# Altium PCB WI-FI_HALOW_FGH100M_EXT01_V30.PcbDoc
Units mm, origin at the board's own origin, x right, y up, seen from the top; angles counter-clockwise.
Board outline 42 x 25 mm, 2 copper layers (F.Cu, B.Cu); 41 components, 40 nets, 168 pads, 199 vias.
Unrouted connection lines stored in the file: 21.
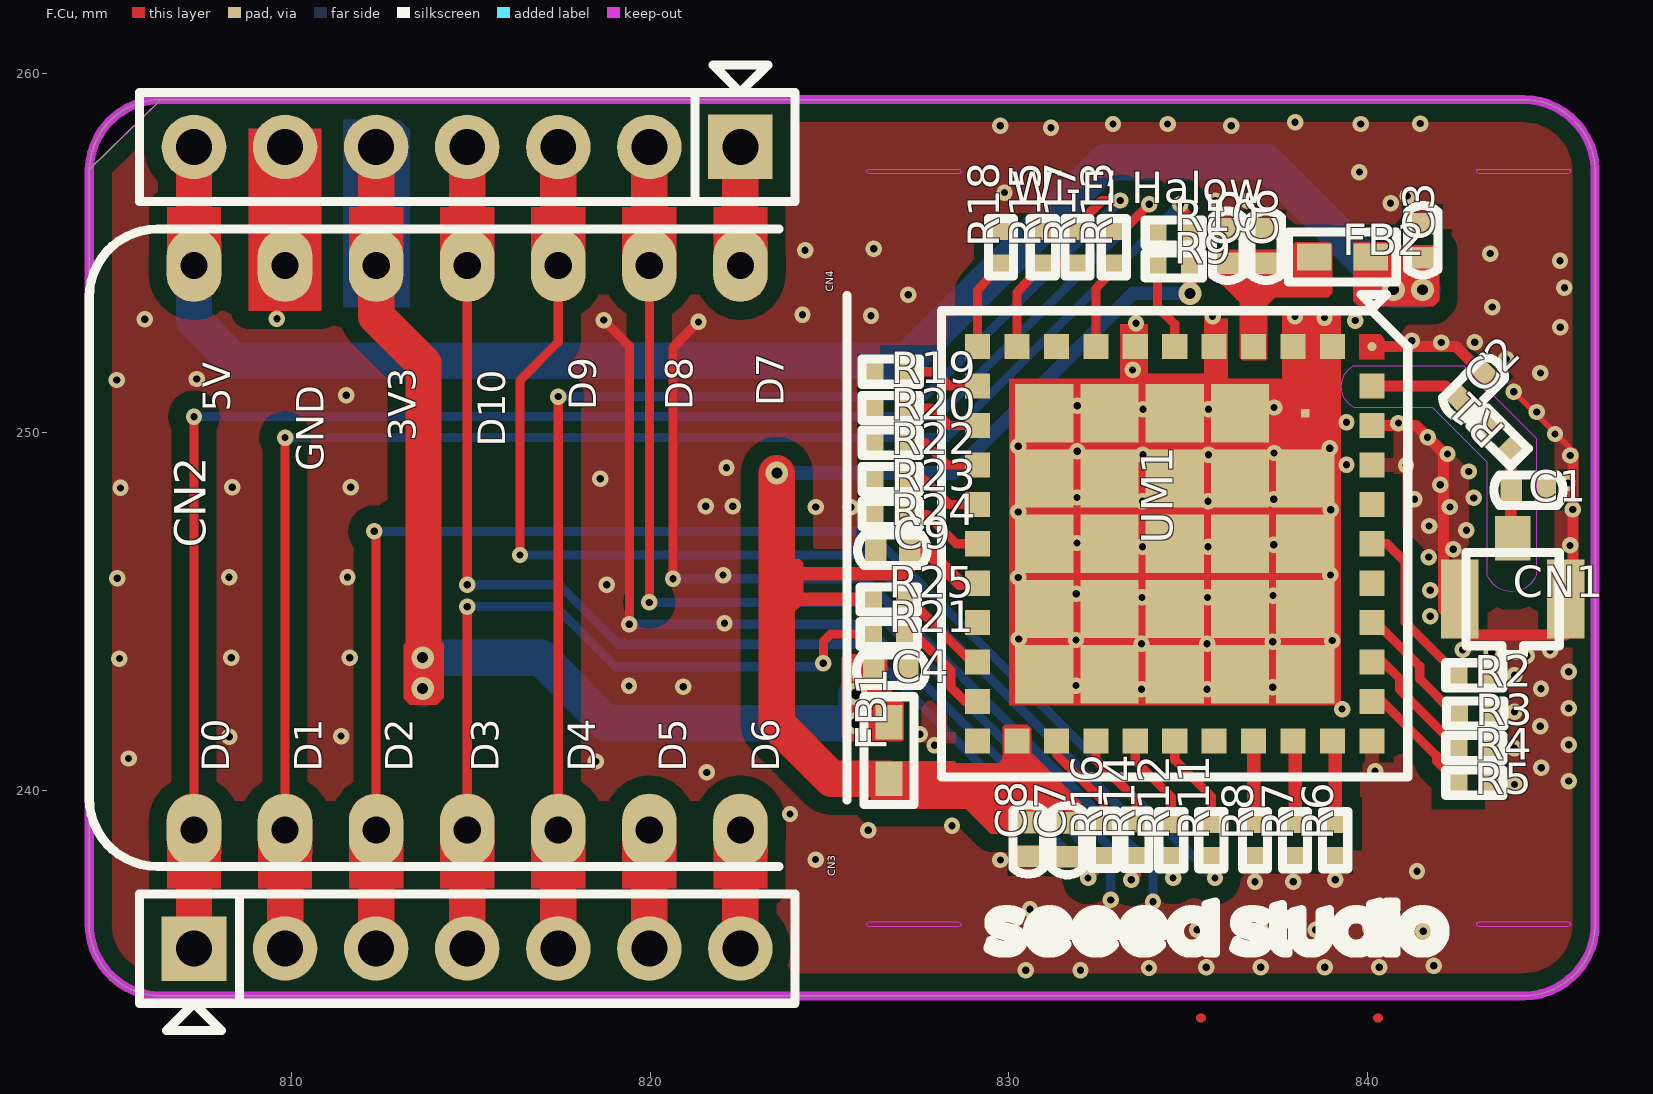
[diagram p0: F.Cu view]
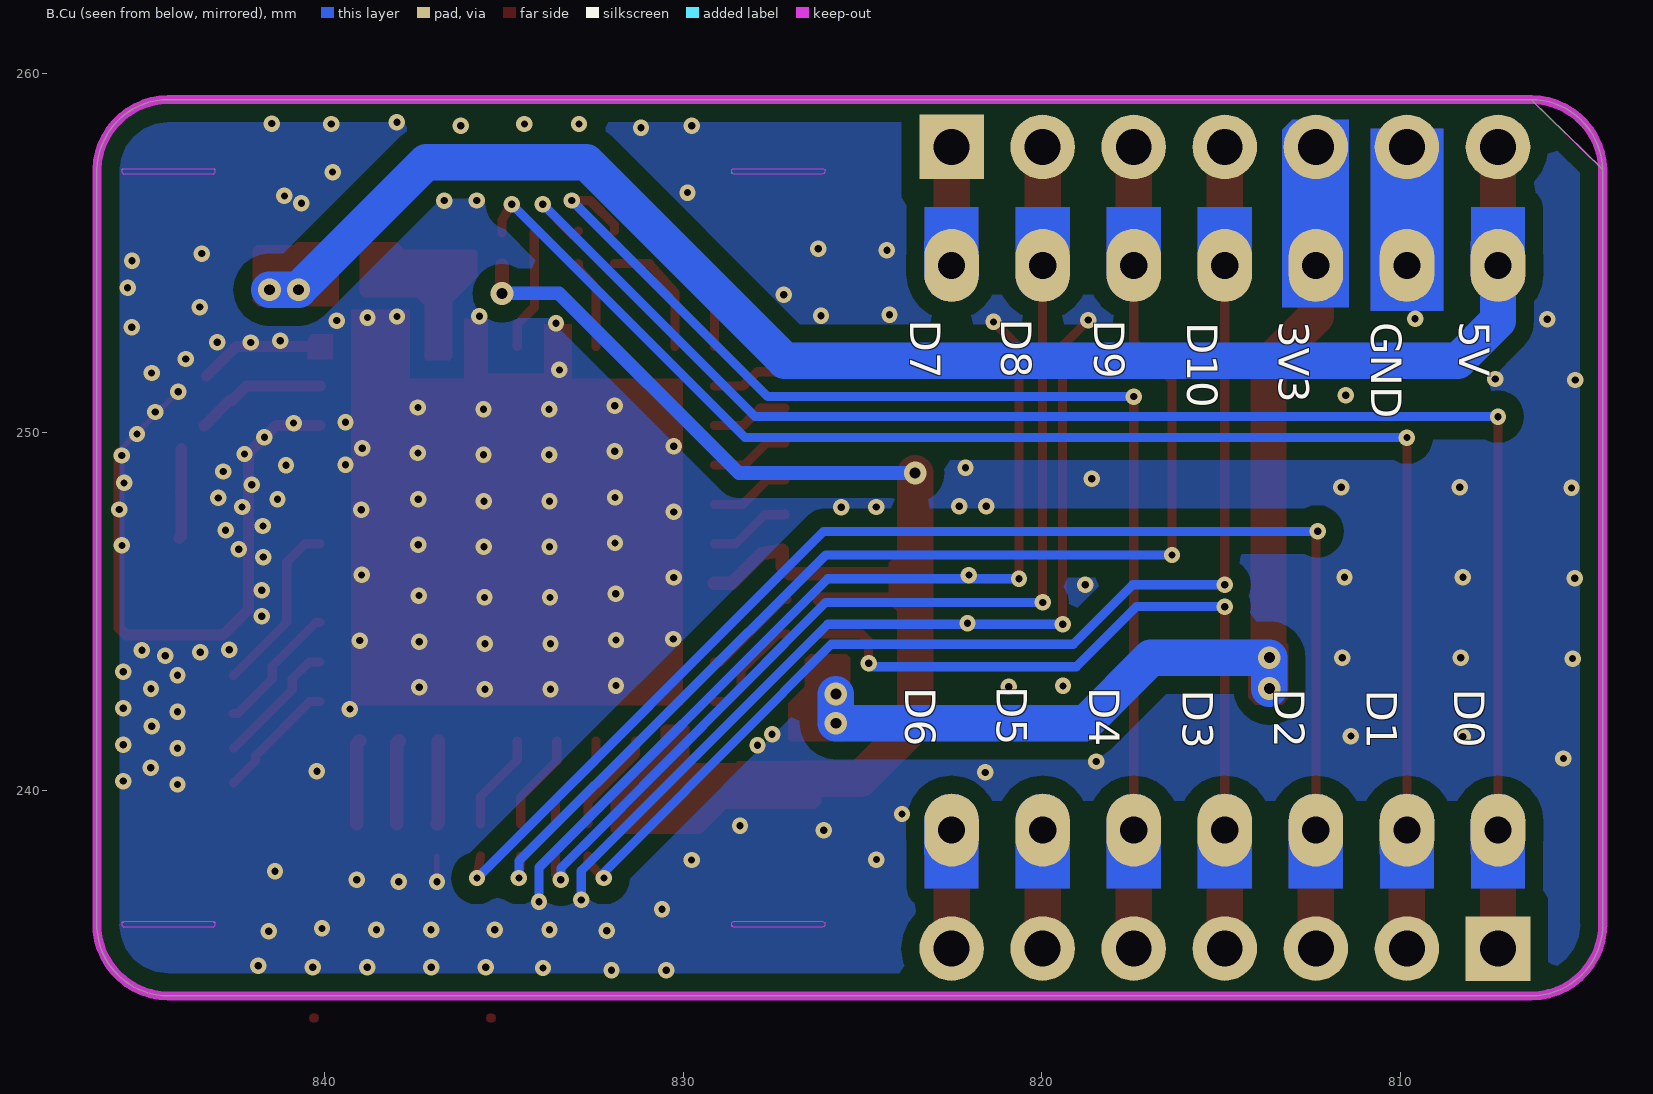
[diagram p1: B.Cu view, seen from below]

## Layer stack, top to bottom
F.Mask: solder mask 0.0102, Solder Resist, Dk 3.5
F.Cu: signal copper 0.0356
Dielectric 1: dielectric 0.32, FR-4, Dk 4.8
B.Cu: signal copper 0.0356
B.Mask: solder mask 0.0102, Solder Resist, Dk 3.5

## Board outline
806.357,259.279 ccw(c806.357,257.279) 804.357,257.33 804.357,236.33 804.357,236.329 ccw(c806.357,236.28) 806.357,234.279 844.357,234.279 ccw(c844.357,236.28) 846.357,236.33 846.357,257.33 ccw(c844.356,257.278) 844.356,259.28 844.357,259.279 806.357,259.279 ccw(c806.357,257.279) 806.357,259.279

## Design rules (kind name [scope] priority, off if disabled: settings)
Clearance "Clearence 0,5_Polygon" [InNamedPolygon('F.Cu-GND') OR InNamedPolygon('B.Cu-GND')] p1: gap=0.5 ignorepadtopadclearanceinfootprint=FALSE
MinimumSolderMaskSliver [All] p1: minsoldermaskwidth=0
PolygonConnect Polygon_B.Cu-GND_ConnectDirect [IsNamedPolygon('B.Cu-GND') vs IsVia] p1: connectstyle=Direct reliefconductorwidth=0.254 reliefentries=4 polygonreliefangle="90 Angle" airgapwidth=0.254
PolygonConnect Polygon_B.Cu-GND_ConnectRelief45 [IsNamedPolygon('B.Cu-GND') vs (IsThruPin or IsSMTPin) and (PadShape_AllLayers = 'Round')] p2: connectstyle=Relief reliefconductorwidth=0.381 reliefentries=4 polygonreliefangle="45 Angle" airgapwidth=0.254
PolygonConnect Polygon_B.Cu-GND_ConnectRelief90 [IsNamedPolygon('B.Cu-GND') vs (IsThruPin or IsSMTPin) and (PadShape_AllLayers <> 'Round')] p3: connectstyle=Relief reliefconductorwidth=0.381 reliefentries=4 polygonreliefangle="90 Angle" airgapwidth=0.254
PolygonConnect Polygon_F.Cu-GND_ConnectDirect [IsNamedPolygon('F.Cu-GND') vs IsVia] p4: connectstyle=Direct reliefconductorwidth=0.254 reliefentries=4 polygonreliefangle="90 Angle" airgapwidth=0.254
PolygonConnect Polygon_F.Cu-GND_ConnectRelief45 [IsNamedPolygon('F.Cu-GND') vs (IsThruPin or IsSMTPin) and (PadShape_AllLayers = 'Round')] p5: connectstyle=Relief reliefconductorwidth=0.381 reliefentries=4 polygonreliefangle="45 Angle" airgapwidth=0.254
PolygonConnect Polygon_F.Cu-GND_ConnectRelief90 [IsNamedPolygon('F.Cu-GND') vs (IsThruPin or IsSMTPin) and (PadShape_AllLayers <> 'Round')] p6: connectstyle=Relief reliefconductorwidth=0.381 reliefentries=4 polygonreliefangle="90 Angle" airgapwidth=0.254
RoutingVias [All] p1: holewidth=0.711 width=1.27 viastyle="Through Hole" minholewidth=0.711 minwidth=1.27 maxholewidth=0.711 maxwidth=1.27
SilkToSilkClearance [All] p1: silktosilkclearance=0
SilkToSolderMaskClearance [IsPad] p1: minsilkscreentomaskgap=0 clearancetoexposedcopper=TRUE
SolderMaskExpansion [All] p1: expansion=0 istentingtop=FALSE
Width [All] p1: maxlimit=10 minlimit=0.254 preferedwidth=0.254 minimp=50.000000 maximp=50.000000 favimp=50.000000
27 further rules are at their usual default settings.

## Components (designator, comment, footprint, x,y, rotation, side; value= is the part's Value field where it differs from the comment)
C1 "Comment" C0402M 844.491,248.388 r0 top value=C0402M
C2 "Comment" C0402M 842.967,251.233 r45 top value=C0402M
C3 "Comment" C0402M 841.544,255.347 r90 top value=C0402M
C4 "Comment" C0402M 826.711,243.359 r0 top value=C0402M
C5 "Comment" C0402M 836.109,255.195 r90 top value=C0402M
C6 "Comment" C0402M 837.175,255.195 r90 top value=C0402M
C7 "Comment" C0402M 831.638,238.634 r270 top value=C0402M
C8 "Comment" C0402M 830.544,238.65 r270 top value=C0402M
C9 "Comment" C0402M 826.761,246.711 r180 top value=C0402M
CN1 "Comment" CON_U.FL-R-SMT-1 844.057,245.346 r180 top value=CON_U.FL-R-SMT-1
CN2 "Comment" CN_ESP32S3_XIAO_DIP14 807.278,246.779 r90 top value=CN_ESP32S3_XIAO_DIP14
CN3 "Comment" HEADER_PIN_SIP7_2MM54 807.278,235.601 r90 top value=HEADER_PIN_SIP7_2MM54
CN4 "Comment" HEADER_PIN_SIP7_2MM54 822.518,257.958 r270 top value=HEADER_PIN_SIP7_2MM54
FB1 "Comment" FB0603 826.66,241.123 r270 top value=FB0603
FB2 "Comment" FB0603 839.309,254.89 r180 top value=FB0603
R1 "Comment" R0402 843.678,249.861 r135 top value=R0402
R2 "Comment" R0402 842.99,243.223 r0 top value=R0402
R3 "Comment" R0402 843.014,242.157 r0 top value=R0402
R4 "Comment" R0402 842.99,241.191 r0 top value=R0402
R5 "Comment" R0402 842.99,240.226 r0 top value=R0402
R6 "Comment" R0402 839.106,238.628 r270 top value=R0402
R7 "Comment" R0402 837.988,238.628 r270 top value=R0402
R8 "Comment" R0402 836.871,238.628 r270 top value=R0402
R9 "Comment" R0402 834.608,254.652 r180 top value=R0402
R10 "Comment" R0402 834.608,255.566 r180 top value=R0402
R11 "Comment" R0402 835.651,238.628 r270 top value=R0402
R12 "Comment" R0402 834.534,238.628 r270 top value=R0402
R13 "Comment" R0402 832.932,255.16 r270 top value=R0402
R14 "Comment" R0402 833.569,238.634 r270 top value=R0402
R15 "Comment" R0402 830.95,255.16 r270 top value=R0402
R16 "Comment" R0402 832.654,238.634 r270 top value=R0402
R17 "Comment" R0402 831.916,255.16 r270 top value=R0402
R18 "Comment" R0402 829.782,255.16 r270 top value=R0402
R19 "Comment" R0402 826.711,251.69 r0 top value=R0402
R20 "Comment" R0402 826.711,250.674 r0 top value=R0402
R21 "Comment" R0402 826.66,244.375 r180 top value=R0402
R22 "Comment" R0402 826.711,249.709 r0 top value=R0402
R23 "Comment" R0402 826.711,248.693 r0 top value=R0402
R24 "Comment" R0402 826.711,247.727 r0 top value=R0402
R25 "Comment" R0402 826.66,245.34 r180 top value=R0402
UM1 "Comment" FGH100M-H 834.631,246.89 r270 top value=FGH100M-H

## Footprints (in the part's own frame and the unit in brackets; to place one, negate y for a bottom-side part, rotate by r counter-clockwise, add the part's x,y. Pads: shape width x height; smd on the part's side, far side on the other; paste and mask are expansions set on the pad)
C0402M [mm]
  rect 0.6x0.65 smd mask+0.102: 1(-0.475,0) 2(0.475,0)
  silkscreen extent -0.96,-0.43 0.97,0.43
CN_ESP32S3_XIAO_DIP14 [mil]
  rrect100% 80x60 hole 30 paste-99999 mask+4: 1(-310,0) 2(-310,-100) 3(-310,-200) 4(-310,-300) 5(-310,-400) 6(-310,-500) 7(-310,-600) 8(310,-600) 9(310,-500) 10(310,-400) 11(310,-300) 12(310,-200) 13(310,-100) 14(310,0)
  F.Cu region: 299.96,-570.47 374.02,-570.47 374.02,-629.53 299.96,-629.78 292.25,-628.77 285.06,-625.79 278.9,-621.06 274.16,-614.89 271.19,-607.71 270.17,-600 271.19,-592.29 274.16,-585.11 278.9,-578.94 285.06,-574.21 292.25,-571.23 299.96,-570.22
  F.Cu region: 299.96,-470.47 374.02,-470.47 374.02,-529.53 299.96,-529.78 292.25,-528.77 285.06,-525.79 278.9,-521.06 274.16,-514.89 271.19,-507.71 270.17,-500 271.19,-492.29 274.16,-485.11 278.9,-478.94 285.06,-474.21 292.25,-471.23 299.96,-470.22
  F.Cu region: 299.96,-370.47 374.02,-370.47 374.02,-429.53 299.96,-429.78 292.25,-428.77 285.06,-425.79 278.9,-421.06 274.16,-414.89 271.19,-407.71 270.17,-400 271.19,-392.29 274.16,-385.11 278.9,-378.94 285.06,-374.21 292.25,-371.23 299.96,-370.22
  F.Cu region: 299.96,-270.47 374.02,-270.47 374.02,-329.53 299.96,-329.78 292.25,-328.77 285.06,-325.79 278.9,-321.06 274.16,-314.89 271.19,-307.71 270.17,-300 271.19,-292.29 274.16,-285.11 278.9,-278.94 285.06,-274.21 292.25,-271.23 299.96,-270.22
  F.Cu region: 299.96,-170.47 374.02,-170.47 374.02,-229.53 299.96,-229.78 292.25,-228.77 285.06,-225.79 278.9,-221.06 274.16,-214.89 271.19,-207.71 270.17,-200 271.19,-192.29 274.16,-185.11 278.9,-178.94 285.06,-174.21 292.25,-171.23 299.96,-170.22
  F.Cu region: 299.96,-70.47 374.02,-70.47 374.02,-129.53 299.96,-129.78 292.25,-128.77 285.06,-125.79 278.9,-121.06 274.16,-114.89 271.19,-107.71 270.17,-100 271.19,-92.29 274.16,-85.11 278.9,-78.94 285.06,-74.21 292.25,-71.23 299.96,-70.22
  F.Cu region: 299.96,29.53 374.02,29.53 374.02,-29.53 299.96,-29.78 292.25,-28.77 285.06,-25.79 278.9,-21.06 274.16,-14.89 271.19,-7.71 270.17,0 271.19,7.71 274.16,14.89 278.9,21.06 285.06,25.79 292.25,28.77 299.96,29.78
  F.Cu region: -292.25,-571.23 -285.06,-574.21 -278.9,-578.94 -274.16,-585.11 -271.19,-592.29 -270.17,-600 -271.19,-607.71 -274.16,-614.89 -278.9,-621.06 -285.06,-625.79 -292.25,-628.77 -299.96,-629.78 -374.02,-629.53 -374.02,-570.47 -299.96,-570.47 -299.96,-570.22
  F.Cu region: -292.25,-471.23 -285.06,-474.21 -278.9,-478.94 -274.16,-485.11 -271.19,-492.29 -270.17,-500 -271.19,-507.71 -274.16,-514.89 -278.9,-521.06 -285.06,-525.79 -292.25,-528.77 -299.96,-529.78 -374.02,-529.53 -374.02,-470.47 -299.96,-470.47 -299.96,-470.22
  F.Cu region: -292.25,-371.23 -285.06,-374.21 -278.9,-378.94 -274.16,-385.11 -271.19,-392.29 -270.17,-400 -271.19,-407.71 -274.16,-414.89 -278.9,-421.06 -285.06,-425.79 -292.25,-428.77 -299.96,-429.78 -374.02,-429.53 -374.02,-370.47 -299.96,-370.47 -299.96,-370.22
  F.Cu region: -292.25,-271.23 -285.06,-274.21 -278.9,-278.94 -274.16,-285.11 -271.19,-292.29 -270.17,-300 -271.19,-307.71 -274.16,-314.89 -278.9,-321.06 -285.06,-325.79 -292.25,-328.77 -299.96,-329.78 -374.02,-329.53 -374.02,-270.47 -299.96,-270.47 -299.96,-270.22
  F.Cu region: -292.25,-171.23 -285.06,-174.21 -278.9,-178.94 -274.16,-185.11 -271.19,-192.29 -270.17,-200 -271.19,-207.71 -274.16,-214.89 -278.9,-221.06 -285.06,-225.79 -292.25,-228.77 -299.96,-229.78 -374.02,-229.53 -374.02,-170.47 -299.96,-170.47 -299.96,-170.22
  F.Cu region: -292.25,-71.23 -285.06,-74.21 -278.9,-78.94 -274.16,-85.11 -271.19,-92.29 -270.17,-100 -271.19,-107.71 -274.16,-114.89 -278.9,-121.06 -285.06,-125.79 -292.25,-128.77 -299.96,-129.78 -374.02,-129.53 -374.02,-70.47 -299.96,-70.47 -299.96,-70.22
  F.Cu region: -292.25,28.77 -285.06,25.79 -278.9,21.06 -274.16,14.89 -271.19,7.71 -270.17,0 -271.19,-7.71 -274.16,-14.89 -278.9,-21.06 -285.06,-25.79 -292.25,-28.77 -299.96,-29.78 -374.02,-29.53 -374.02,29.53 -299.96,29.53 -299.96,29.78
  B.Cu region: 299.85,-570.47 374.02,-570.47 374.02,-629.53 299.85,-629.78 292.14,-628.77 284.96,-625.79 278.79,-621.06 274.06,-614.89 271.08,-607.71 270.07,-600 271.08,-592.29 274.06,-585.11 278.79,-578.94 284.96,-574.21 292.14,-571.23 299.85,-570.22
  B.Cu region: 299.85,-470.47 374.02,-470.47 374.02,-529.53 299.85,-529.78 292.14,-528.77 284.96,-525.79 278.79,-521.06 274.06,-514.89 271.08,-507.71 270.07,-500 271.08,-492.29 274.06,-485.11 278.79,-478.94 284.96,-474.21 292.14,-471.23 299.85,-470.22
  B.Cu region: 299.85,-370.47 374.02,-370.47 374.02,-429.53 299.85,-429.78 292.14,-428.77 284.96,-425.79 278.79,-421.06 274.06,-414.89 271.08,-407.71 270.07,-400 271.08,-392.29 274.06,-385.11 278.79,-378.94 284.96,-374.21 292.14,-371.23 299.85,-370.22
  B.Cu region: 299.85,-270.47 374.02,-270.47 374.02,-329.53 299.85,-329.78 292.14,-328.77 284.96,-325.79 278.79,-321.06 274.06,-314.89 271.08,-307.71 270.07,-300 271.08,-292.29 274.06,-285.11 278.79,-278.94 284.96,-274.21 292.14,-271.23 299.85,-270.22
  B.Cu region: 299.85,-170.47 374.02,-170.47 374.02,-229.53 299.85,-229.78 292.14,-228.77 284.96,-225.79 278.79,-221.06 274.06,-214.89 271.08,-207.71 270.07,-200 271.08,-192.29 274.06,-185.11 278.79,-178.94 284.96,-174.21 292.14,-171.23 299.85,-170.22
  B.Cu region: 299.85,-70.47 374.02,-70.47 374.02,-129.53 299.85,-129.78 292.14,-128.77 284.96,-125.79 278.79,-121.06 274.06,-114.89 271.08,-107.71 270.07,-100 271.08,-92.29 274.06,-85.11 278.79,-78.94 284.96,-74.21 292.14,-71.23 299.85,-70.22
  B.Cu region: 299.85,29.53 374.02,29.53 374.02,-29.53 299.85,-29.78 292.14,-28.77 284.96,-25.79 278.79,-21.06 274.06,-14.89 271.08,-7.71 270.07,0 271.08,7.71 274.06,14.89 278.79,21.06 284.96,25.79 292.14,28.77 299.85,29.78
  B.Cu region: -292.14,-571.23 -284.96,-574.21 -278.79,-578.94 -274.06,-585.11 -271.08,-592.29 -270.07,-600 -271.08,-607.71 -274.06,-614.89 -278.79,-621.06 -284.96,-625.79 -292.14,-628.77 -299.85,-629.78 -374.02,-629.53 -374.02,-570.47 -299.85,-570.47 -299.85,-570.22
  B.Cu region: -292.14,-471.23 -284.96,-474.21 -278.79,-478.94 -274.06,-485.11 -271.08,-492.29 -270.07,-500 -271.08,-507.71 -274.06,-514.89 -278.79,-521.06 -284.96,-525.79 -292.14,-528.77 -299.85,-529.78 -374.02,-529.53 -374.02,-470.47 -299.85,-470.47 -299.85,-470.22
  B.Cu region: -292.14,-371.23 -284.96,-374.21 -278.79,-378.94 -274.06,-385.11 -271.08,-392.29 -270.07,-400 -271.08,-407.71 -274.06,-414.89 -278.79,-421.06 -284.96,-425.79 -292.14,-428.77 -299.85,-429.78 -374.02,-429.53 -374.02,-370.47 -299.85,-370.47 -299.85,-370.22
  B.Cu region: -292.14,-271.23 -284.96,-274.21 -278.79,-278.94 -274.06,-285.11 -271.08,-292.29 -270.07,-300 -271.08,-307.71 -274.06,-314.89 -278.79,-321.06 -284.96,-325.79 -292.14,-328.77 -299.85,-329.78 -374.02,-329.53 -374.02,-270.47 -299.85,-270.47 -299.85,-270.22
  B.Cu region: -292.14,-171.23 -284.96,-174.21 -278.79,-178.94 -274.06,-185.11 -271.08,-192.29 -270.07,-200 -271.08,-207.71 -274.06,-214.89 -278.79,-221.06 -284.96,-225.79 -292.14,-228.77 -299.85,-229.78 -374.02,-229.53 -374.02,-170.47 -299.85,-170.47 -299.85,-170.22
  B.Cu region: -292.14,-71.23 -284.96,-74.21 -278.79,-78.94 -274.06,-85.11 -271.08,-92.29 -270.07,-100 -271.08,-107.71 -274.06,-114.89 -278.79,-121.06 -284.96,-125.79 -292.14,-128.77 -299.85,-129.78 -374.02,-129.53 -374.02,-70.47 -299.85,-70.47 -299.85,-70.22
  B.Cu region: -292.14,28.77 -284.96,25.79 -278.79,21.06 -274.06,14.89 -271.08,7.71 -270.07,0 -271.08,-7.71 -274.06,-14.89 -278.79,-21.06 -284.96,-25.79 -292.14,-28.77 -299.85,-29.78 -374.02,-29.53 -374.02,29.53 -299.85,29.53 -299.85,29.78
  silkscreen extent -350,-717 350,115
CON_U.FL-R-SMT-1 [mm]
  rect 1x1.25 smd mask+0.102: 1(0,-1.7)
  rect 1.05x2.2 smd mask+0.102: 2(1.475,0) 3(-1.475,0)
  silkscreen extent -1.3,-1.3 1.3,1.55
FB0603 [mil]
  rect 38x30 smd mask+4: 1(-31,0) 2(31,0)
  silkscreen extent -59,-28 59,28
FGH100M-H [mm]
  round 0.25 smd mask+0.05: 1(-5.5,5.5)
  rect 0.7x0.7 smd mask+0.05: 2(-5.5,4.4) 3(-5.5,3.3) 4(-5.5,2.2) 5(-5.5,1.1) 6(-5.5,0) 7(-5.5,-1.1) 8(-5.5,-2.2) 9(-5.5,-3.3) 10(-5.5,-4.4) 11(-5.5,-5.5) 12(-4.4,-5.5) 13(-3.3,-5.5) 14(-2.2,-5.5) 15(-1.1,-5.5) 16(0,-5.5) 17(1.1,-5.5) 18(2.2,-5.5) 19(3.3,-5.5) 20(4.4,-5.5) 21(5.5,-5.5) 22(5.5,-4.4) 23(5.5,-3.3) 24(5.5,-2.2) 25(5.5,-1.1) 26(5.5,0) 27(5.5,1.1) 28(5.5,2.2) 29(5.5,3.3) 30(5.5,4.4) 31(5.5,5.5) 32(4.4,5.5) 33(3.3,5.5) 34(2.2,5.5) 35(1.1,5.5) 36(0,5.5) 37(-1.1,5.5) 38(-2.2,5.5) 39(-3.3,5.5) 40(-4.4,5.5)
  rect 0.25x0.25 smd mask+0.05: 41(-3.64,3.64)
  rect 1.62x1.62 smd mask+0.05: 42(-1.82,3.64) 43(0,3.64) 44(1.82,3.64) 45(3.64,3.64) 46(-3.64,1.82) 47(-1.82,1.82) 48(0,1.82) 49(1.82,1.82) 50(3.64,1.82) 51(-3.64,0) 52(-1.82,0) 53(0,0) 54(1.82,0) 55(3.64,0) 56(-3.64,-1.82) 57(-1.82,-1.82) 58(0,-1.82) 59(1.82,-1.82) 60(3.64,-1.82) 61(-3.64,-3.64) 62(-1.82,-3.64) 63(0,-3.64) 64(1.82,-3.64) 65(3.64,-3.64)
  F.Cu region: -2.83,2.83 -4.45,2.83 -4.45,4.25 -4.25,4.45 -2.83,4.45
  F.Cu region: -5.15,5.15 -5.85,5.15 -5.85,5.725 -5.725,5.85 -5.15,5.85
  silkscreen extent -6.95,-6.5 6.5,6.5
HEADER_PIN_SIP7_2MM54 [mm]
  rect 1.8x1.8 hole 1 paste-2539.97 mask+0.102: 1(0,0)
  round 1.8 hole 1 paste-2539.97 mask+0.102: 2(0,-2.54) 3(0,-5.08) 4(0,-7.62) 5(0,-10.16) 6(0,-12.7) 7(0,-15.24)
  silkscreen extent -2.29,-16.76 1.52,1.52
R0402 [mm]
  rect 0.5x0.5 smd mask+0.102: 1(-0.45,0) 2(0.45,0)
  silkscreen extent -0.8,-0.35 0.8,0.35

## Part data
C1 C2 C3 C4 C5 C6 C7 C8 C9: library part C0402M
CN1: library part CON_U.FL-R-SMT-1
CN2: library part CN_ESP32S3_XIAO_DIP14
CN3 CN4: library part HEADER_PIN_SIP7_2MM54
FB1 FB2: library part FB0603
R1 R2 R3 R4 R5 R6 R7 R8 R9 R10 R11 R12 R13 R14 R15 R16 R17 R18 R19 R20 R21 R22 R23 R24 R25: library part R0402
UM1: library part FGH100M-H

## Via types
v1: diameter 0.457, hole 0.203, F.Cu to B.Cu, tented both sides, 191 vias
v2: diameter 0.635, hole 0.305, F.Cu to B.Cu, tented both sides, 8 vias

## Nets (pads, with @x,y where several pads share a name; then routed paths per layer and width w, separated by ;. In a path a pad name is that pad's centre, name@x,y a point inside that pad or via, vN(x,y) a via of type N, cw(c..) or ccw(c..) an arc to the next point about the centre after c; other vN are vias at no path point)
3V3: C4.1 CN2.12 CN4.5 FB1.1 | length 31.4
  F.Cu w0.152: v2(825.745,241.885) 825.745,242.343 ; v2(825.745,242.698) 825.745,242.343 ; FB1.1 825.898,241.911 825.745,242.063 825.745,242.343
  F.Cu w1.016: CN4.5 CN2.12 812.358,253.241 813.678,251.92 813.678,243.738 v2(813.655,243.714)
  B.Cu w1.016: v2(813.655,242.851) v2(813.655,243.714) 816.957,243.714 818.786,241.885 v2(825.745,241.885) v2(825.745,242.698)
ANT_WIFI: C1.1 CN1.1 R1.1 | length 3.1
  F.Cu w0.318: R1.1 844.006,249.533 844.006,248.845 ; C1.1 C1.1 844.017,248.337 844.006,248.348 844.006,248.845 ; CN1.1 844.006,247.097 844.006,248.845
ANT_WIFI_MOD: C2.1 R1.2 UM1.40 | length 3.7
  F.Cu w0.318: UM1.40 842.182,251.29 842.575,250.897 C2.1 842.642,250.897 R1.2
BUSY: R15.2 R17.2 UM1.10 | length 3.6
  F.Cu w0.254: UM1.10 830.231,253.89 R15.2 R17.2
GND: C1.2 C2.2 C3.2 C4.2 C5.2 C6.2 C7.2 C8.2 C9.2 CN1.2 CN1.3 CN2.13 CN4.6 R2.2 R3.2 R4.2 R5.2 R6.2 R7.2 R8.2 R15.1 R18.1 R19.1 R20.1 R22.1 R23.1 R24.1 UM1.1 UM1.2 UM1.3 UM1.5 UM1.7 UM1.18 UM1.21 UM1.31 UM1.38 UM1.39 UM1.41 UM1.42 UM1.43 UM1.44 UM1.45 UM1.46 UM1.47 UM1.48 UM1.49 UM1.50 UM1.51 UM1.52 UM1.53 UM1.54 UM1.55 UM1.56 UM1.57 UM1.58 UM1.59 UM1.60 UM1.61 UM1.62 UM1.63 UM1.64 UM1.65 | length 76.6
  F.Cu w0.152: v1(836.871,237.466) R8.2 ; v1(844.084,251.131) 845.733,249.482 v1@845.733,249.424
  F.Cu w0.254: v1(818.708,253.129) 819.419,252.418 v1(819.419,244.646) ; v1(820.638,245.916) 820.638,252.367 v1(821.349,253.079)
  F.Cu w0.305: UM1.39 841.357,250.19 842.126,249.421 842.126,245.052 842.838,244.341 845.53,244.341 845.733,244.544 845.733,249.424 v1(845.659,249.353) ; UM1.1 842.481,252.39 C2.2
  F.Cu w1.016: CN2.13 CN4.6
  B.Cu w0.254: v1(819.419,244.646) 825.972,244.646 832.847,237.771 v1(832.847,236.958) ; v1(820.638,245.916) 825.972,245.916 834.026,237.862 v1(834.026,236.907)
  other v1: 830.478,234.999 832.002,234.999 833.914,235.057 835.51,235.079 837.034,235.079 838.812,235.079 840.336,235.079 841.855,235.12 841.561,236.081 832.137,236.1 833.733,236.122 835.257,236.122 837.035,236.122 838.559,236.122 840.078,236.163 830.593,236.7 837.937,237.466 839.106,237.517 841.388,237.761 829.77,238.071 824.614,238.082 826.079,238.901 828.42,239.024 823.899,239.354 844.108,240.175 845.617,240.271 821.58,240.514 840.219,240.55 844.852,240.643 818.481,240.819 805.453,240.902 844.108,241.191 827.93,241.269 845.617,241.287 808.259,241.506 811.379,241.527 827.523,241.581 844.826,241.804 844.108,242.207 839.298,242.281 845.617,242.303 833.705,242.834 835.534,242.834 844.846,242.851 820.919,242.901 837.362,242.885 819.41,242.926 831.876,242.936 844.108,243.223 845.617,243.319 805.197,243.688 808.317,243.71 811.619,243.71 844.446,243.767 843.475,243.867 845.1,243.917 842.664,243.934 833.705,244.104 835.534,244.104 837.362,244.155 839.024,244.19 831.876,244.206 830.28,244.235 822.073,244.678 841.756,244.871 833.717,245.394 835.546,245.394 837.374,245.445 831.888,245.496 841.756,245.593 818.786,245.746 805.137,245.932 830.267,245.949 808.256,245.954 811.558,245.954 822.034,246.017 838.974,246.022 841.715,246.519 842.4,246.736 833.733,246.81 835.561,246.81 837.39,246.861 845.657,246.845 831.904,246.912 842.767,247.272 841.725,247.387 830.267,247.778 838.983,247.843 845.73,247.847 824.62,247.918 825.593,247.913 842.306,247.915 821.549,247.94 822.303,247.935 833.733,248.08 835.561,248.08 837.39,248.131 841.319,248.132 831.904,248.182 842.968,248.17 805.227,248.449 808.347,248.47 811.649,248.47 842.04,248.536 845.596,248.587 818.605,248.701 842.83,248.908 822.131,249.015 839.422,249.095 841.081,249.077 833.744,249.37 835.573,249.37 842.239,249.395 837.402,249.421 831.916,249.472 838.953,249.556 830.267,249.607 841.684,249.864 845.237,249.953 840.87,250.257 839.422,250.279 844.73,250.565 833.744,250.64 835.573,250.64 837.402,250.691 831.916,250.742 811.521,251.029 805.125,251.459 807.356,251.487 844.83,251.652 833.456,251.739 843.881,252.045 842.061,252.503 842.995,252.509 841.239,252.553 845.382,252.93 833.552,253.044 839.662,253.115 805.908,253.15 809.591,253.163 838.808,253.199 835.686,253.236 837.985,253.229 826.161,253.251 824.25,253.275 843.484,253.492 827.2,253.838 845.499,254.035 845.377,254.781 843.434,254.984 824.322,255.079 826.234,255.118 840.651,256.385 835.757,256.466 836.669,256.462 841.125,256.592 829.884,256.685 839.782,257.257 831.181,258.497 836.21,258.548 829.767,258.55 832.908,258.599 834.432,258.599 839.817,258.599 841.476,258.61 837.988,258.649
MOD_3V3: C7.1 C8.1 C9.1 FB1.2 R9.1 R25.2 UM1.17 UM1.22 | length 34.3
  F.Cu w0.381: 823.51,245.34 R25.2 ; 823.534,246.051 827.033,246.051 827.236,246.254 C9.1 827.822,246.61 828.641,245.79 UM1.17 ; v2(835.058,253.874) R9.1
  F.Cu w1.016: v2(823.534,248.862) 823.534,246.051 823.534,241.862 825.06,240.336 FB1.2
  B.Cu w0.381: v2(823.534,248.862) 828.455,248.862 833.467,253.874 v2(835.058,253.874)
MOD_5V: C5.1 C6.1 FB2.2 UM1.4
N34310028: R6.1 UM1.30 | length 2.3
  F.Cu w0.381: UM1.30 839.106,241.316 R6.1
N34310043: R7.1 UM1.29 | length 2.3
  F.Cu w0.381: UM1.29 837.988,241.333 R7.1
N34310055: R8.1 UM1.28 | length 2.3
  F.Cu w0.381: UM1.28 836.831,239.118 R8.1
N34310477: R18.2 UM1.11 | length 2.6
  F.Cu w0.254: UM1.11 829.131,253.959 R18.2
N34310504: R19.2 UM1.12 | length 2.1
  F.Cu w0.254: R19.2 827.937,251.69 828.336,251.29 UM1.12
N34310586: R20.2 UM1.13 | length 2.2
  F.Cu w0.254: R20.2 827.853,250.674 828.336,250.19 UM1.13
N34310613: R22.2 UM1.14 | length 2.2
  F.Cu w0.254: R22.2 827.667,249.709 828.285,249.091 UM1.14
N34310640: R23.2 UM1.15 | length 2.3
  F.Cu w0.254: R23.2 827.161,248.672 827.654,248.672 828.336,247.99 UM1.15
N34310667: R24.2 UM1.16 | length 2.3
  F.Cu w0.254: R24.2 827.161,247.7 827.73,247.7 828.539,246.89 UM1.16
N34311591: R25.1 UM1.19 | length 2.7
  F.Cu w0.254: R25.1 827.219,245.34 828.968,243.59 UM1.19
N34312565: R5.1 UM1.32 | length 3.4
  F.Cu w0.254: UM1.32 840.421,242.49 841.93,240.981 841.93,240.836 R5.1
N34312570: R4.1 UM1.33 | length 3.6
  F.Cu w0.254: UM1.33 840.439,243.59 840.907,243.122 840.907,242.824 R4.1
N34312575: R3.1 UM1.34 | length 3.7
  F.Cu w0.254: UM1.34 840.253,244.69 841.466,243.477 841.466,243.122 842.431,242.157 R3.1
N34312580: R2.1 UM1.36 | length 4.9
  F.Cu w0.254: UM1.36 840.552,246.89 841.06,246.382 841.06,244.704 R2.1
PA02_A0_D0: CN2.1 CN3.1 R13.1 | length 45.3
  F.Cu w0.254: CN2.1 v1(807.278,250.437) ; R13.1 833.084,255.51 v1(833.924,256.363)
  F.Cu w1.016: CN3.1 CN2.1
  B.Cu w0.254: v1(807.278,250.437) 827.998,250.437 v1(833.924,256.363)
PA4_A1_D1: CN2.2 CN3.2 R10.1 | length 42.8
  F.Cu w0.254: CN2.2 v1(809.818,249.853) ; v1(834.788,256.363) 835.058,255.913 R10.1
  F.Cu w1.016: CN3.2 CN2.2
  B.Cu w0.254: v1(809.818,249.853) 828.277,249.853 v1(834.788,256.363)
PA5_A9_D9_MISO: CN2.10 CN4.3 R12.2 | length 34.7
  F.Cu w0.254: v1(816.371,246.576) 816.371,251.453 817.438,252.52 CN2.10 ; R12.2 v1(834.585,237.567)
  F.Cu w1.016: CN2.10 CN4.3
  B.Cu w0.254: v1(816.371,246.576) 826.023,246.576 834.585,238.042 v1(834.585,237.567)
PA6_A10_D10_MOSI: CN2.11 CN4.4 R16.2 | length 33.8
  F.Cu w0.254: v1(814.898,245.746) CN2.11 ; v1(832.215,237.567) 832.654,238.007 R16.2
  F.Cu w1.016: CN2.11 CN4.4
  B.Cu w0.254: v1(814.898,245.746) 817.465,245.746 819.124,244.087 825.87,244.087 831.241,238.694 832.215,237.72 v1(832.215,237.567)
PA7_A8_D8_SCK: CN2.9 CN4.2 R14.2 | length 30.3
  F.Cu w0.254: v1(819.978,245.255) CN2.9 ; v1(833.416,237.517) 833.569,237.669 R14.2
  F.Cu w1.016: CN2.9 CN4.2
  B.Cu w0.254: v1(819.978,245.255) 826.023,245.255 832.841,238.415 833.416,237.839 v1(833.416,237.517)
PA8_A4_D4_SDA: CN2.5 CN3.5 R17.1 | length 35
  F.Cu w0.254: CN2.5 v1(817.438,250.996) ; R17.1 831.916,255.777 832.603,256.465 v1(833.111,256.465)
  F.Cu w1.016: CN3.5 CN2.5
  B.Cu w0.254: v1(817.438,250.996) 827.642,250.996 v1(833.111,256.465)
PA9_A5_D5_SCL: CN2.6 CN3.6 | length 3.3
  F.Cu w1.016: CN3.6 CN2.6
PA10_A2_D2: CN2.3 CN3.3 R11.2 | length 39.7
  F.Cu w0.254: v1(812.307,247.237) 812.358,247.186 CN2.3 ; R11.2 v1(835.753,237.567)
  F.Cu w1.016: CN3.3 CN2.3
  B.Cu w0.254: v1(812.307,247.237) 826.084,247.237 v1(835.753,237.567)
PA11_A3_D3: CN2.4 CN3.4 R21.2 | length 22.3
  F.Cu w0.254: CN2.4 v1(814.898,245.137) ; v1(824.831,243.562) 824.831,244.171 825.034,244.375 R21.2
  F.Cu w1.016: CN3.4 CN2.4
  B.Cu w0.254: v1(814.898,245.137) 817.363,245.137 819.04,243.46 824.831,243.46 v1(824.831,243.562)
PB08_A6_D6_TX: CN2.7 CN3.7 | length 3.3
  F.Cu w1.016: CN3.7 CN2.7
PB09_A7_D7_RX: CN2.8 CN4.1 | length 3.3
  F.Cu w1.016: CN2.8 CN4.1
RESET: R13.2 UM1.8 | length 2.5
  F.Cu w0.254: UM1.8 832.431,254.014 832.932,254.573 R13.2
SPI_CLK: R14.1 UM1.24 | length 2.8
  F.Cu w0.254: UM1.24 832.431,240.869 833.569,239.732 R14.1
SPI_CS: R21.1 UM1.20 | length 3.1
  F.Cu w0.254: R21.1 827.371,244.375 828.387,243.359 828.387,242.897 828.793,242.49 UM1.20
SPI_INT: R11.1 UM1.26 | length 2.7
  F.Cu w0.254: UM1.26 834.631,240.864 835.651,239.843 R11.1
SPI_MISO: R12.1 UM1.25 | length 2.7
  F.Cu w0.254: UM1.25 833.531,240.836 834.534,239.833 R12.1
SPI_MOSI: R16.1 UM1.23 | length 2.9
  F.Cu w0.254: UM1.23 831.331,241.024 832.654,239.701 R16.1
VDD_5V: C3.1 CN2.14 CN4.7 FB2.1 | length 44.2
  F.Cu w0.152: v2(841.544,253.976) C3.1
  F.Cu w1.016: CN2.14 CN4.7
  B.Cu w1.016: CN2.14 807.278,253.112 808.395,251.995 827.168,251.995 832.705,257.532 837.175,257.532 v2(840.731,253.976) v2(841.544,253.976)
WAKEUP_IN: R9.2 R10.2 UM1.6 | length 3.4
  F.Cu w0.254: R10.2 R9.2 834.151,254.545 834.151,253.495 834.631,253.015 UM1.6
pads on no net: UM1.9 UM1.27 UM1.35 UM1.37
copper on no net: | length 0.3
  F.Cu w0.254: 835.349,233.659 835.375,233.659 ; 835.349,233.659 835.366,233.664 ; 835.349,233.659 835.366,233.664 ; 835.366,233.664 835.375,233.664 ; 835.366,233.664 835.373,233.666 ; 835.366,233.664 835.373,233.666 ; 835.366,233.664 835.375,233.664 ; 835.366,233.664 835.375,233.659 ; 835.366,233.664 835.375,233.659 ; 835.373,233.666 835.375,233.664 ; 835.373,233.666 835.375,233.664 ; 835.375,233.659 835.375,233.664 ; 835.375,233.659 835.375,233.664 ; 840.287,233.659 840.304,233.663 ; 840.287,233.659 840.304,233.663 ; 840.287,233.659 840.313,233.659 ; 840.304,233.663 840.311,233.665 ; 840.304,233.663 840.311,233.665 ; 840.304,233.663 840.313,233.659 ; 840.304,233.663 840.313,233.663 ; 840.304,233.663 840.313,233.663 ; 840.304,233.663 840.313,233.659 ; 840.311,233.665 840.313,233.663 ; 840.311,233.665 840.313,233.663 ; 840.313,233.659 840.313,233.663 ; 840.313,233.659 840.313,233.663

## Polygon pours and split planes (outlines as drawn)
GND on F.Cu "F.Cu-GND" (solid, remove dead copper, pour order 2): 802.96,260.495 802.96,232.555 847.41,232.555 847.41,260.495
GND on B.Cu "B.Cu-GND" (solid, remove dead copper, pour order 3): 803.214,260.241 803.214,233.063 846.902,233.063 846.902,260.241

## Keep-outs
F.Cu:
  region: 806.394,259.331 806.417,259.299 806.417,259.26 806.394,259.228 806.357,259.216 806.232,259.216 805.984,259.184 805.743,259.12 805.511,259.026 805.294,258.903 805.094,258.753 804.915,258.579 804.76,258.384 804.632,258.17 804.532,257.941 804.462,257.701 804.423,257.454 804.42,257.33 804.407,257.293 804.375,257.27 804.335,257.271 804.304,257.295 804.293,257.333 804.317,257.597 804.375,257.856 804.465,258.106 804.587,258.342 804.738,258.56 804.916,258.757 805.118,258.93 805.34,259.075 805.579,259.191 805.831,259.275 806.092,259.326 806.357,259.343
  region: 846.407,236.368 846.42,236.331 846.409,236.057 846.361,235.787 846.278,235.525 846.161,235.277 846.012,235.047 845.834,234.838 845.63,234.655 845.403,234.501 845.158,234.378 844.899,234.288 844.63,234.234 844.357,234.216 844.319,234.228 844.296,234.26 844.296,234.299 844.319,234.331 844.357,234.343 844.486,234.343 844.741,234.377 844.99,234.445 845.228,234.545 845.45,234.676 845.653,234.835 845.833,235.019 845.987,235.226 846.112,235.452 846.207,235.692 846.268,235.942 846.296,236.199 846.293,236.327 846.304,236.365 846.336,236.389 846.375,236.39
  region: 804.415,257.355 804.42,257.33 804.42,236.33 804.415,236.306 804.381,236.272 804.332,236.272 804.298,236.306 804.293,236.33 804.293,257.33 804.298,257.355 804.332,257.389 804.381,257.389
  region: 844.381,259.338 844.415,259.304 844.415,259.255 844.381,259.221 844.357,259.216 806.357,259.216 806.332,259.221 806.298,259.255 806.298,259.304 806.332,259.338 806.357,259.343 844.357,259.343
  region: 828.631,257.338 828.665,257.304 828.665,257.255 828.631,257.221 828.607,257.216 826.107,257.216 826.082,257.221 826.048,257.255 826.048,257.304 826.082,257.338 826.107,257.343 828.607,257.343
  region: 845.631,257.338 845.665,257.304 845.665,257.255 845.631,257.221 845.607,257.216 843.107,257.216 843.082,257.221 843.048,257.255 843.048,257.304 843.082,257.338 843.107,257.343 845.607,257.343
  region: 846.415,257.355 846.42,257.33 846.42,236.33 846.415,236.306 846.381,236.272 846.332,236.272 846.298,236.306 846.293,236.33 846.293,257.33 846.298,257.355 846.332,257.389 846.381,257.389
  region: 844.381,234.338 844.415,234.304 844.415,234.255 844.381,234.221 844.357,234.216 806.357,234.216 806.332,234.221 806.298,234.255 806.298,234.304 806.332,234.338 806.357,234.343 844.357,234.343
  region: 828.631,236.338 828.665,236.304 828.665,236.255 828.631,236.221 828.607,236.216 826.107,236.216 826.082,236.221 826.048,236.255 826.048,236.304 826.082,236.338 826.107,236.343 828.607,236.343
  region: 804.378,236.389 804.409,236.365 804.42,236.327 804.417,236.199 804.445,235.942 804.506,235.692 804.601,235.452 804.726,235.226 804.88,235.019 805.06,234.835 805.263,234.676 805.486,234.545 805.723,234.445 805.972,234.377 806.228,234.343 806.357,234.343 806.394,234.331 806.417,234.299 806.417,234.26 806.394,234.228 806.357,234.216 806.083,234.234 805.814,234.289 805.555,234.378 805.31,234.501 805.083,234.655 804.879,234.839 804.701,235.047 804.552,235.277 804.435,235.525 804.352,235.787 804.305,236.057 804.293,236.331 804.306,236.368 804.338,236.39
  region: 845.631,236.338 845.665,236.304 845.665,236.255 845.631,236.221 845.607,236.216 843.107,236.216 843.082,236.221 843.048,236.255 843.048,236.304 843.082,236.338 843.107,236.343 845.607,236.343
  region: 844.621,259.326 844.881,259.275 845.133,259.191 845.373,259.075 845.595,258.93 845.797,258.757 845.975,258.56 846.126,258.342 846.248,258.105 846.338,257.856 846.396,257.597 846.42,257.332 846.409,257.294 846.378,257.27 846.339,257.269 846.306,257.292 846.293,257.329 846.29,257.454 846.251,257.7 846.181,257.94 846.081,258.169 845.953,258.383 845.798,258.579 845.619,258.753 845.419,258.903 845.201,259.026 844.97,259.12 844.728,259.184 844.481,259.216 844.356,259.216 844.318,259.228 844.295,259.26 844.295,259.299 844.318,259.331 844.356,259.343
  region: 842.695,251.859 844.717,249.838 844.717,246.017 844.718,246.018 844.678,245.923 844.56,245.769 844.405,245.65 844.225,245.575 844.031,245.55 843.838,245.575 843.658,245.65 843.503,245.769 843.385,245.923 843.346,246.017 843.346,249.167 841.822,250.691 839.637,250.691 839.637,250.689 839.607,250.701 839.47,250.807 839.364,250.944 839.298,251.104 839.275,251.275 839.298,251.447 839.364,251.607 839.47,251.744 839.607,251.849 839.636,251.861
B.Cu:
  region: 806.394,259.331 806.417,259.299 806.417,259.26 806.394,259.228 806.357,259.216 806.232,259.216 805.984,259.184 805.743,259.12 805.511,259.026 805.294,258.903 805.094,258.753 804.915,258.579 804.76,258.384 804.632,258.17 804.532,257.941 804.462,257.701 804.423,257.454 804.42,257.33 804.407,257.293 804.375,257.27 804.335,257.271 804.304,257.295 804.293,257.333 804.317,257.597 804.375,257.856 804.465,258.106 804.587,258.342 804.738,258.56 804.916,258.757 805.118,258.93 805.34,259.075 805.579,259.191 805.831,259.275 806.092,259.326 806.357,259.343
  region: 846.407,236.368 846.42,236.331 846.409,236.057 846.361,235.787 846.278,235.525 846.161,235.277 846.012,235.047 845.834,234.838 845.63,234.655 845.403,234.501 845.158,234.378 844.899,234.288 844.63,234.234 844.357,234.216 844.319,234.228 844.296,234.26 844.296,234.299 844.319,234.331 844.357,234.343 844.486,234.343 844.741,234.377 844.99,234.445 845.228,234.545 845.45,234.676 845.653,234.835 845.833,235.019 845.987,235.226 846.112,235.452 846.207,235.692 846.268,235.942 846.296,236.199 846.293,236.327 846.304,236.365 846.336,236.389 846.375,236.39
  region: 804.415,257.355 804.42,257.33 804.42,236.33 804.415,236.306 804.381,236.272 804.332,236.272 804.298,236.306 804.293,236.33 804.293,257.33 804.298,257.355 804.332,257.389 804.381,257.389
  region: 844.381,259.338 844.415,259.304 844.415,259.255 844.381,259.221 844.357,259.216 806.357,259.216 806.332,259.221 806.298,259.255 806.298,259.304 806.332,259.338 806.357,259.343 844.357,259.343
  region: 828.631,257.338 828.665,257.304 828.665,257.255 828.631,257.221 828.607,257.216 826.107,257.216 826.082,257.221 826.048,257.255 826.048,257.304 826.082,257.338 826.107,257.343 828.607,257.343
  region: 845.631,257.338 845.665,257.304 845.665,257.255 845.631,257.221 845.607,257.216 843.107,257.216 843.082,257.221 843.048,257.255 843.048,257.304 843.082,257.338 843.107,257.343 845.607,257.343
  region: 846.415,257.355 846.42,257.33 846.42,236.33 846.415,236.306 846.381,236.272 846.332,236.272 846.298,236.306 846.293,236.33 846.293,257.33 846.298,257.355 846.332,257.389 846.381,257.389
  region: 844.381,234.338 844.415,234.304 844.415,234.255 844.381,234.221 844.357,234.216 806.357,234.216 806.332,234.221 806.298,234.255 806.298,234.304 806.332,234.338 806.357,234.343 844.357,234.343
  region: 828.631,236.338 828.665,236.304 828.665,236.255 828.631,236.221 828.607,236.216 826.107,236.216 826.082,236.221 826.048,236.255 826.048,236.304 826.082,236.338 826.107,236.343 828.607,236.343
  region: 804.378,236.389 804.409,236.365 804.42,236.327 804.417,236.199 804.445,235.942 804.506,235.692 804.601,235.452 804.726,235.226 804.88,235.019 805.06,234.835 805.263,234.676 805.486,234.545 805.723,234.445 805.972,234.377 806.228,234.343 806.357,234.343 806.394,234.331 806.417,234.299 806.417,234.26 806.394,234.228 806.357,234.216 806.083,234.234 805.814,234.289 805.555,234.378 805.31,234.501 805.083,234.655 804.879,234.839 804.701,235.047 804.552,235.277 804.435,235.525 804.352,235.787 804.305,236.057 804.293,236.331 804.306,236.368 804.338,236.39
  region: 845.631,236.338 845.665,236.304 845.665,236.255 845.631,236.221 845.607,236.216 843.107,236.216 843.082,236.221 843.048,236.255 843.048,236.304 843.082,236.338 843.107,236.343 845.607,236.343
  region: 844.621,259.326 844.881,259.275 845.133,259.191 845.373,259.075 845.595,258.93 845.797,258.757 845.975,258.56 846.126,258.342 846.248,258.105 846.338,257.856 846.396,257.597 846.42,257.332 846.409,257.294 846.378,257.27 846.339,257.269 846.306,257.292 846.293,257.329 846.29,257.454 846.251,257.7 846.181,257.94 846.081,258.169 845.953,258.383 845.798,258.579 845.619,258.753 845.419,258.903 845.201,259.026 844.97,259.12 844.728,259.184 844.481,259.216 844.356,259.216 844.318,259.228 844.295,259.26 844.295,259.299 844.318,259.331 844.356,259.343
Edge.Cuts:
  lines w0: 804.357,257.331 cw(c806.357,257.279) 806.357,259.279 ; 804.357,257.331 cw(c806.357,257.279) 806.357,259.279 ; 804.357,257.331 806.357,259.279 ; 804.357,257.331 804.357,257.33 804.357,236.33 804.357,236.329 ccw(c806.357,236.28) 806.357,234.279 844.357,234.279 ccw(c844.357,236.28) 846.357,236.329 846.357,236.33 846.357,257.33 ccw(c844.356,257.278) 844.356,259.28 844.357,259.279 806.357,259.279
  lines w0.254: 804.357,236.329 ccw(c806.357,236.28) 806.357,234.279 844.357,234.279 ccw(c844.357,236.28) 846.357,236.329 ; 804.357,236.329 804.357,236.33 ; 804.357,236.329 804.357,236.33 ; 804.357,236.33 804.357,257.33 ; 804.357,257.33 804.357,257.331 ; 804.357,257.33 804.357,257.331 ; 804.357,257.331 cw(c806.357,257.279) 806.357,259.279 ; 804.357,257.331 cw(c806.357,257.279) 806.357,259.279 ; 806.357,259.279 844.357,259.279 844.356,259.28 cw(c844.356,257.278) 846.357,257.33 846.357,236.33 ; 846.357,236.329 846.357,236.33 ; 846.357,236.329 846.357,236.33

## Other copper
F.Cu:
  region: 840.858,255.22 841.9,255.22 842.014,255.106 842.014,253.671 841.855,253.512 839.766,253.512 839.611,253.668 839.611,255.297 840.782,255.297
  region: 824.272,246.356 824.272,245.238 823.967,244.933 823.155,244.933 823.028,245.06 823.028,246.457 824.171,246.457
  region: 839.03,255.22 839.03,253.874 838.915,253.76 837.429,253.76 837.207,253.538 837.207,252.045 837.166,252.004 836.515,252.004 836.444,252.076 836.444,253.62 835.743,254.321 835.743,255.032 835.804,255.093 837.785,255.093 837.988,255.297 838.953,255.297
  region: 830.629,241.739 830.629,241.073 832.022,239.679 832.022,238.888 831.932,238.798 829.505,238.798 828.799,239.503 826.304,239.503 826.155,239.653 826.155,240.819 828.489,240.819 828.539,240.768 829.708,240.768 829.835,240.895 829.835,241.784 829.898,241.847 830.521,241.847
  region: 810.834,253.383 808.802,253.383 808.802,258.463 810.834,258.463
  region: 839.258,242.393 830.013,242.393 830.013,251.487 833.111,251.487 833.111,253.011 833.873,253.011 833.873,251.639 835.448,251.639 835.448,253.163 836.109,253.163 836.109,251.487 837.633,251.487 837.633,253.417 839.258,253.417
  region: 826.609,243.663 826.609,242.901 827.066,242.444 827.066,241.428 827.015,241.377 825.491,241.377 825.339,241.53 825.339,243.714 825.441,243.816 826.457,243.816
  region: 814.239,244.095 814.239,242.597 814.049,242.406 813.299,242.406 813.128,242.578 813.128,244.07 813.23,244.171 814.163,244.171
B.Cu:
  region: 813.297,258.438 813.297,253.485 811.443,253.485 811.443,258.717 813.018,258.717
  region: 810.834,253.383 808.802,253.383 808.802,258.463 810.834,258.463

## Silkscreen, mask and mechanical layers (free items; w line width, h text height)
F.SilkS:
  drawing of 23786 lines, arcs and shapes, not listed
  text "Wi-Fi Halow" at 830.071,256.094 h1.5
  text "D7" at 823.976,250.722 h1.31 r90
  text "D9" at 818.741,250.619 h1.31 r90
  text "D8" at 821.44,250.619 h1.31 r90
  text "5V" at 808.54,250.579 h1.31 r90
  text "3V3" at 813.718,249.756 h1.31 r90
  text "D10" at 816.208,249.603 h1.31 r90
  text "GND" at 811.154,248.915 h1.31 r90
  text "D0" at 808.512,240.528 h1.31 r90
  text "D1" at 811.092,240.528 h1.31 r90
  text "D2" at 813.636,240.528 h1.31 r90
  text "D3" at 816.03,240.528 h1.31 r90
  text "D4" at 818.716,240.528 h1.31 r90
  text "D5" at 821.259,240.528 h1.31 r90
  text "D6" at 823.85,240.528 h1.31 r90
B.SilkS:
  text "D8" at 821.421,253.168 h1.47 r90
  text "D9" at 818.837,253.136 h1.47 r90
  text "D7" at 823.968,253.136 h1.47 r90
  text "5V" at 808.65,253.098 h1.47 r90
  text "3V3" at 813.686,253.103 h1.47 r90
  text "GND" at 811.109,253.071 h1.47 r90
  text "D10" at 816.237,253.071 h1.47 r90
  text "D5" at 821.549,242.915 h1.47 r90
  text "D4" at 818.969,242.883 h1.47 r90
  text "D6" at 824.1,242.883 h1.47 r90
  text "D0" at 808.786,242.845 h1.47 r90
  text "D2" at 813.811,242.85 h1.47 r90
  text "D1" at 811.23,242.818 h1.47 r90
  text "D3" at 816.369,242.818 h1.47 r90
User.1:
  circle w0.254: c844.357,257.279 r1.25
  circle w0.254: c827.357,257.279 r1.25
  circle w0.254: c844.357,236.279 r1.25
  circle w0.254: c827.357,236.279 r1.25
  lines w0.254: 804.357,241.204 804.357,246.779 ; 804.357,236.279 ccw(c806.357,236.279) 806.357,234.279 844.357,234.279 ccw(c844.357,236.279) 846.357,236.279 846.357,257.279 ccw(c844.357,257.28) 844.357,259.279 806.357,259.279 ccw(c806.357,257.28) 804.357,257.279 804.357,236.279 ; 804.357,239.879 ccw(c806.357,239.879) 806.357,237.879 823.357,237.879 ccw(c823.357,239.879) 825.357,239.879 825.357,253.679 ccw(c823.357,253.68) 823.357,255.679 806.357,255.679 ccw(c806.357,253.68) 804.357,253.679 804.357,239.879